# Altium PCB Sound_Sensor.PcbDoc (part 1 of 6)
Units mm, origin at the board's own origin, x right, y up, seen from the top; angles counter-clockwise.
Board outline 90.25 x 88.01 mm, 2 copper layers (Top Layer, Bottom Layer), stack 1.448 mm thick; 369 components, 272 nets, 1045 pads, 508 vias.
Unrouted connection lines stored in the file: 15.
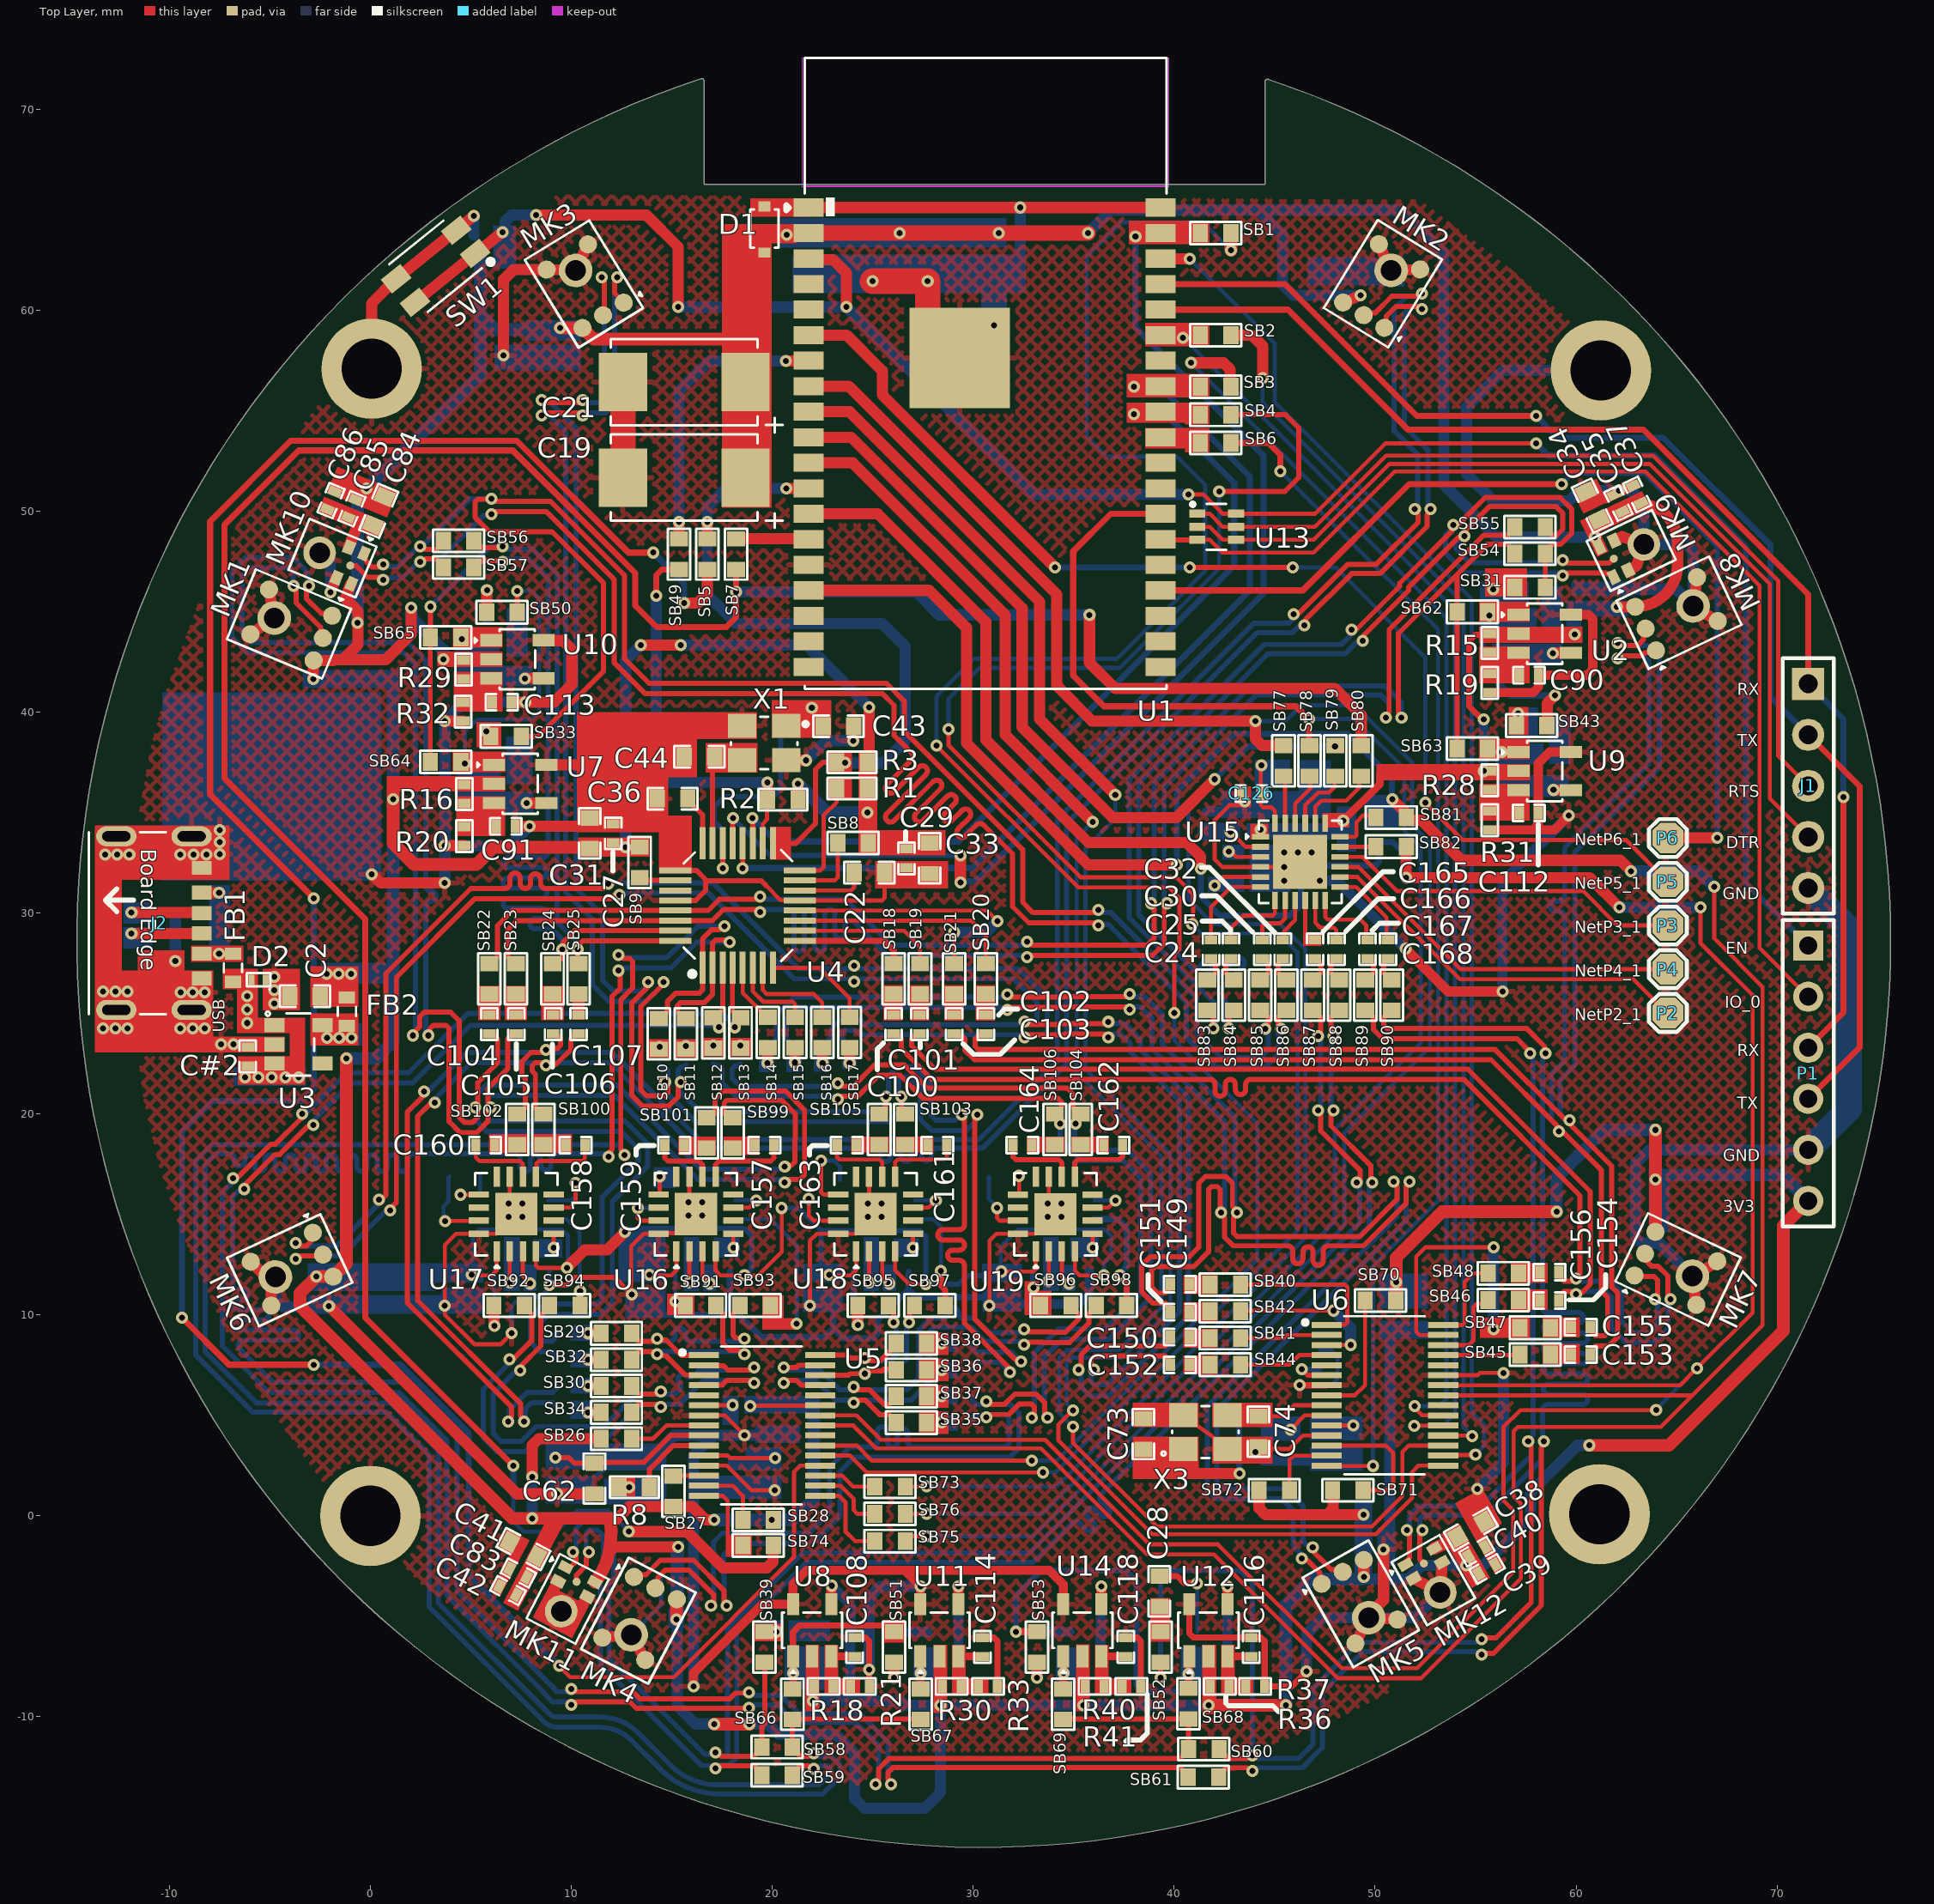
[diagram p0: Top Layer view]
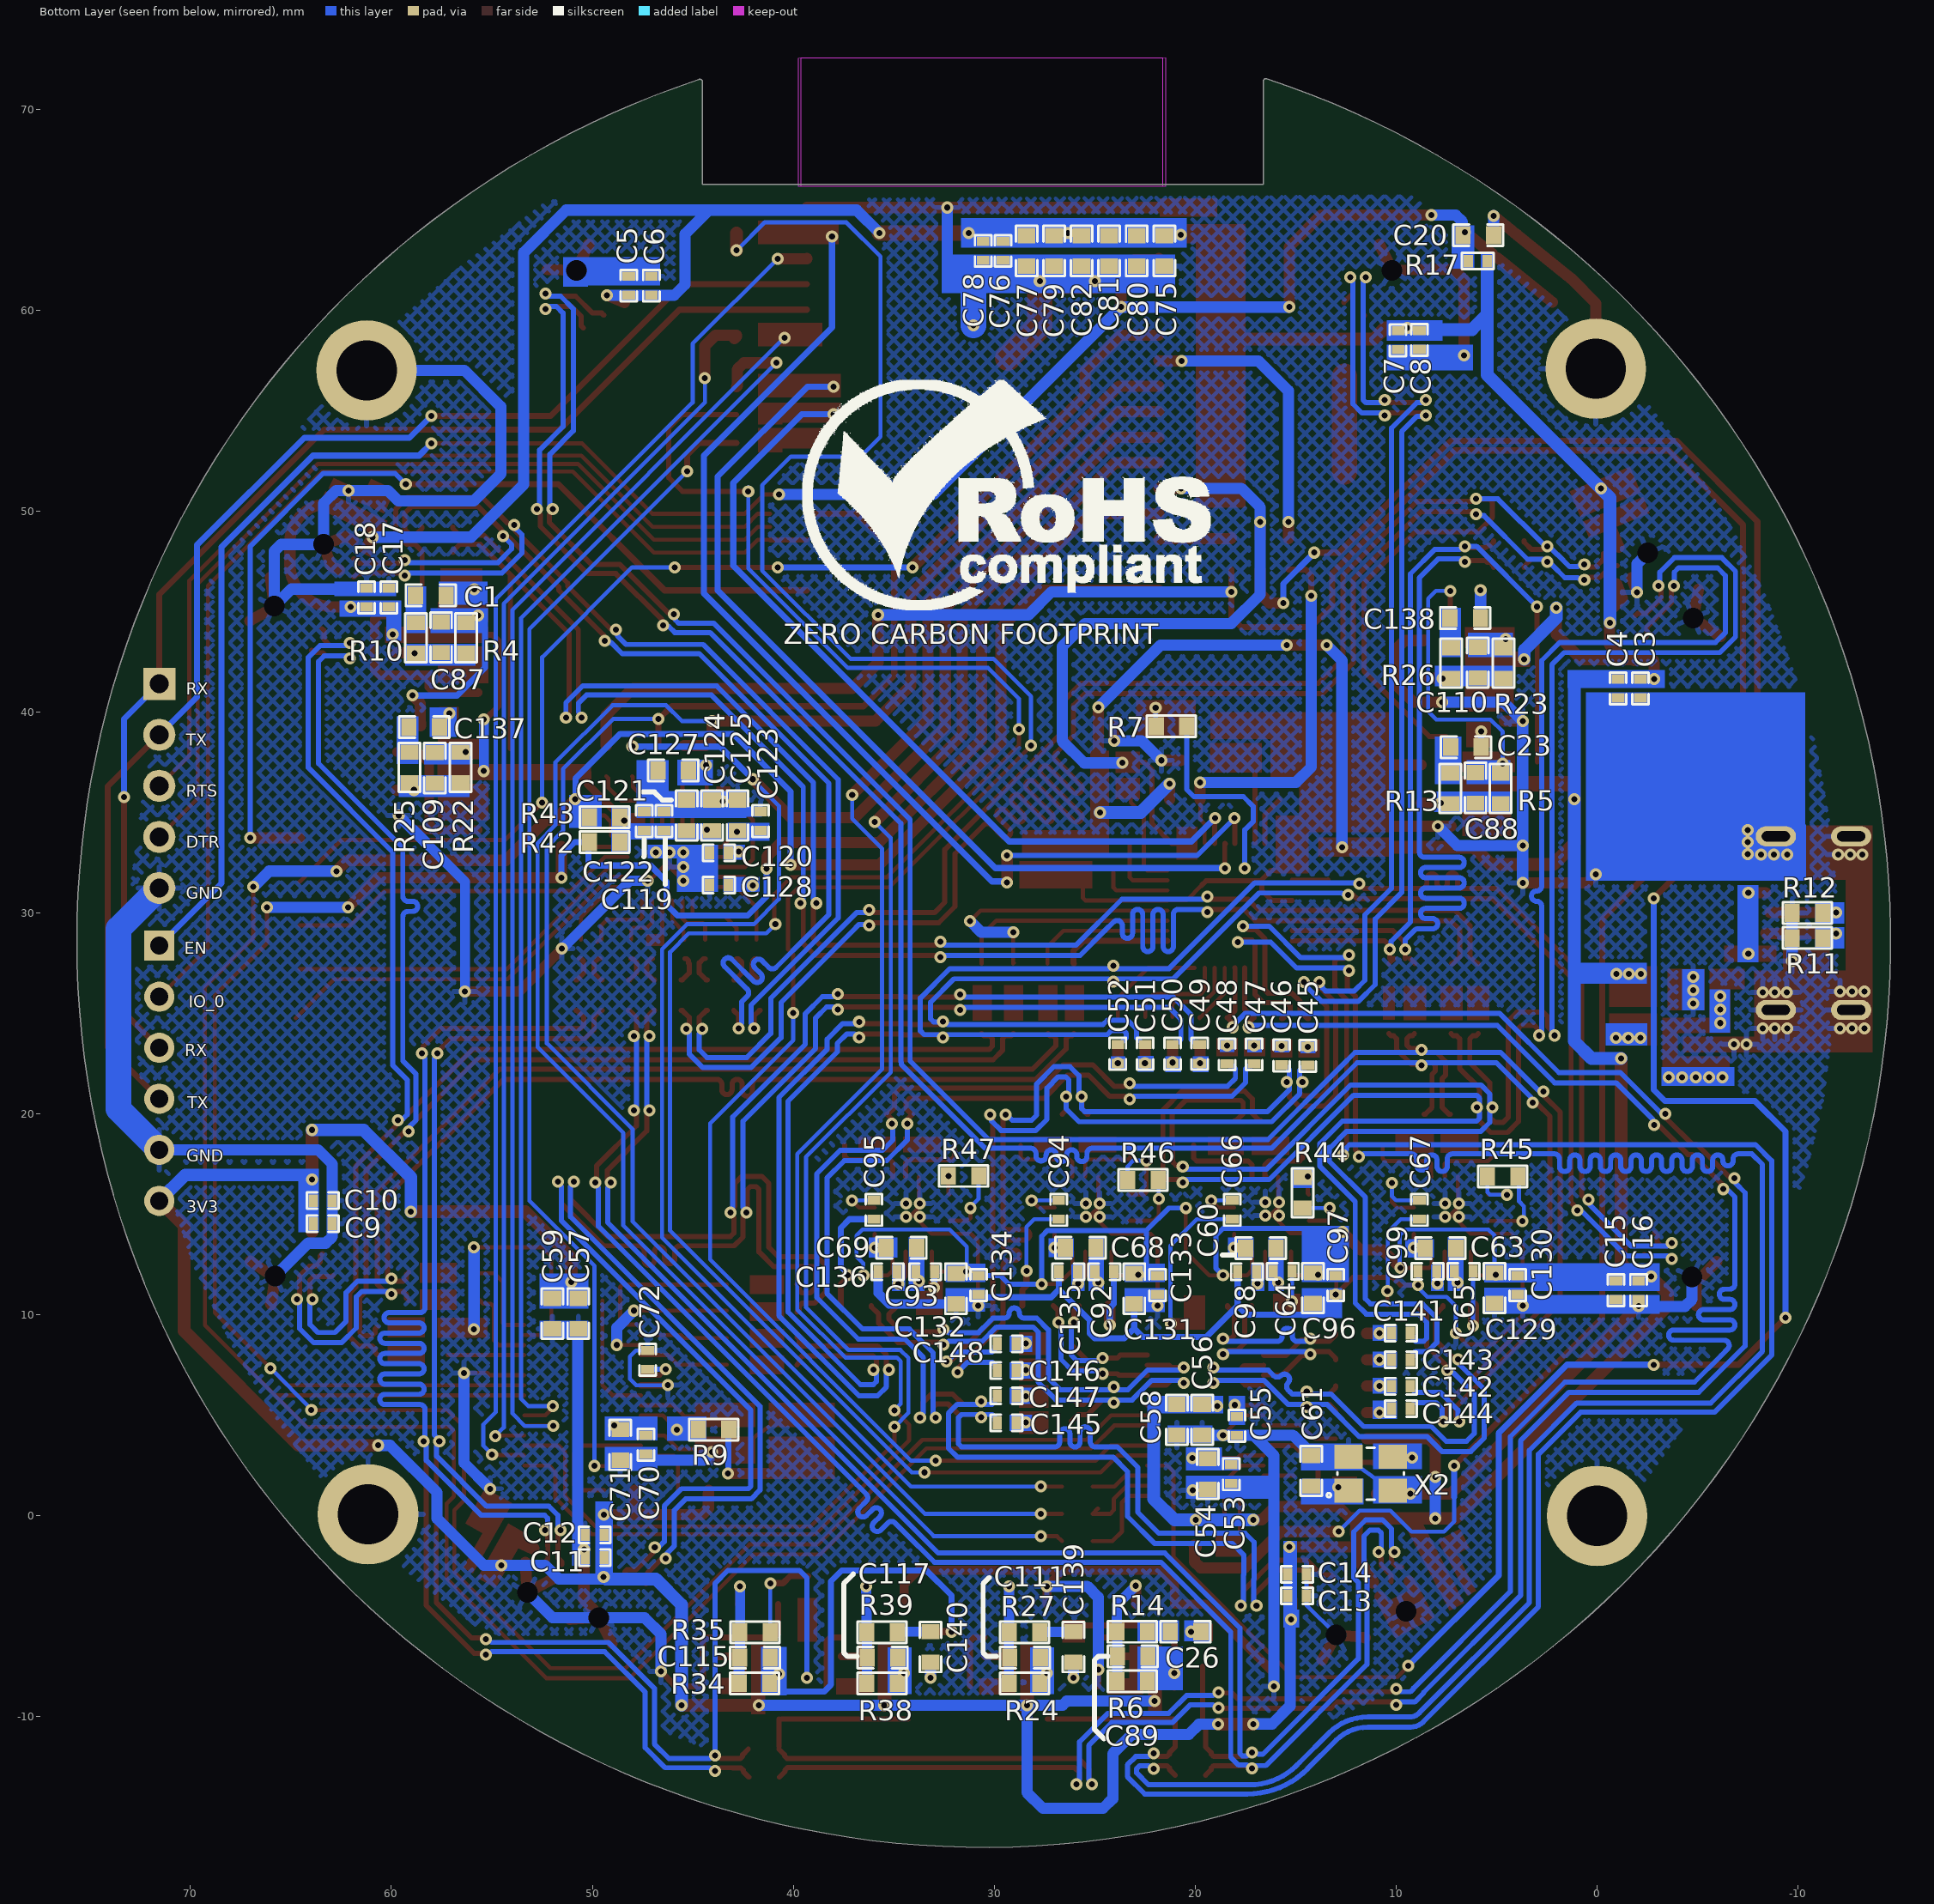
[diagram p1: Bottom Layer view, seen from below]
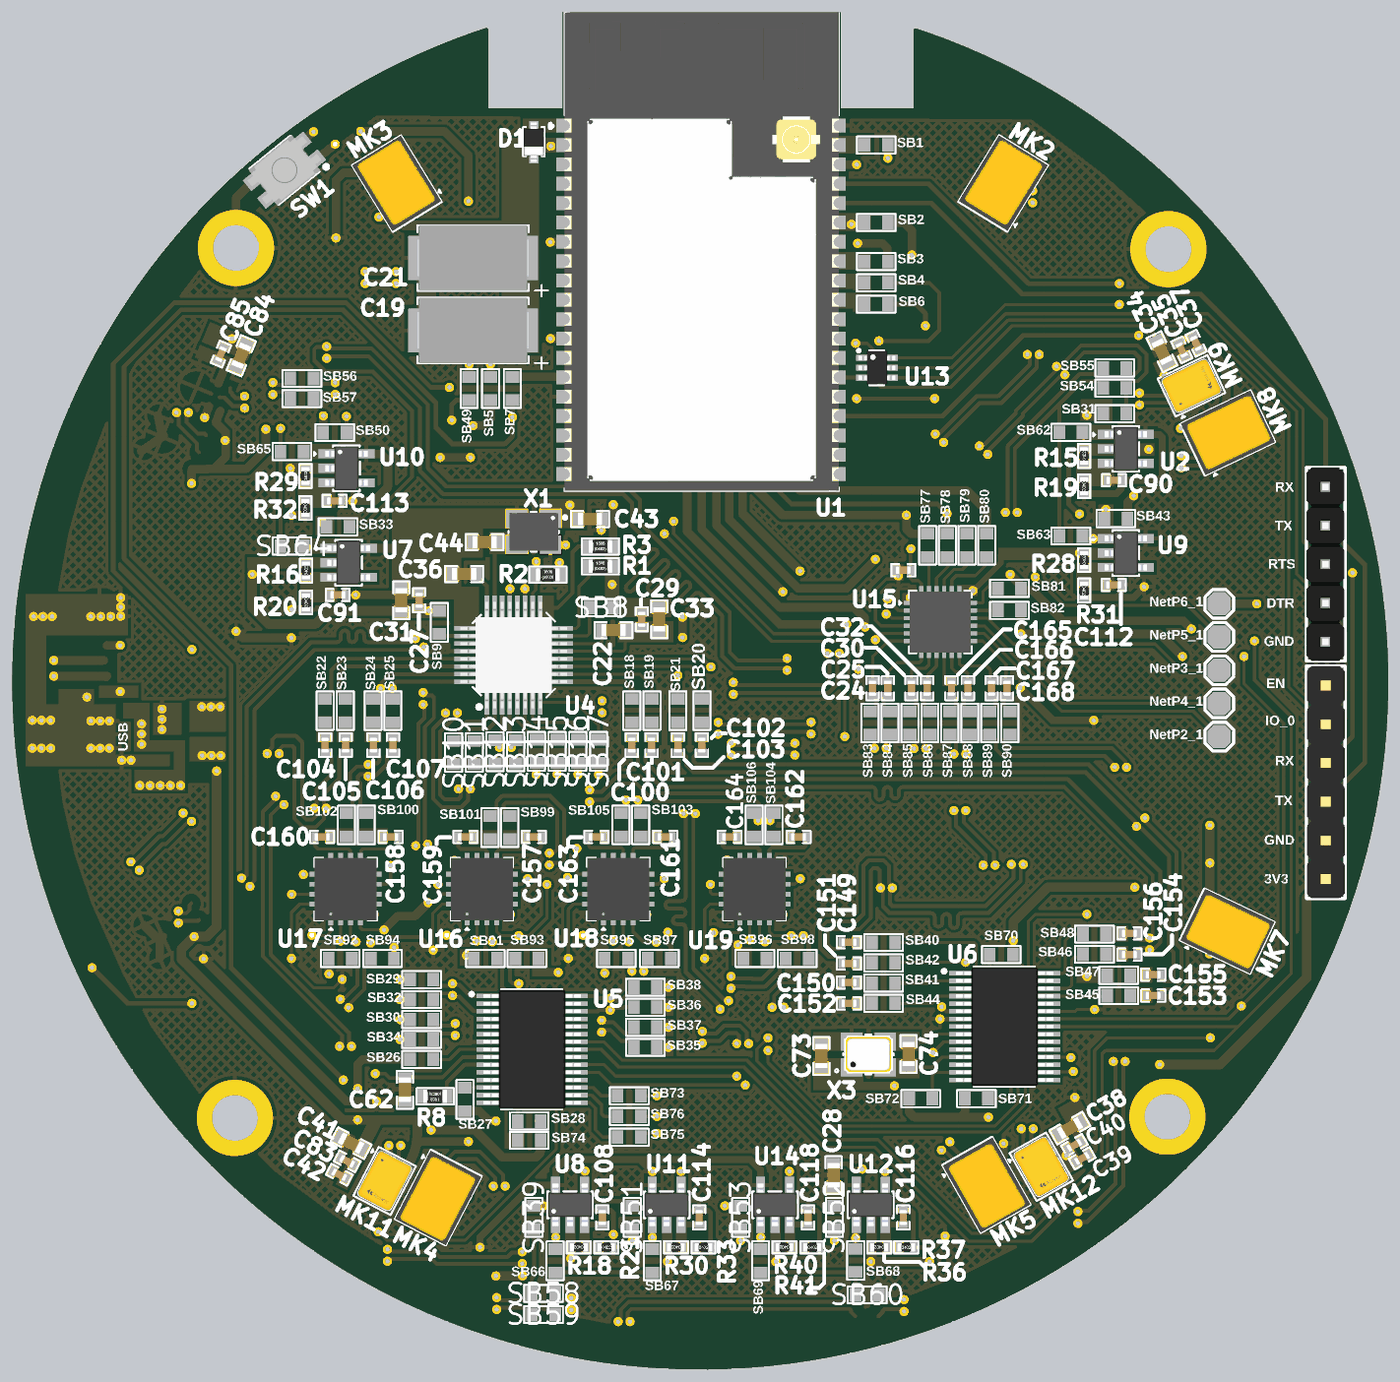
[diagram p6: 3D render of the assembled board from above, using the file's embedded part models]
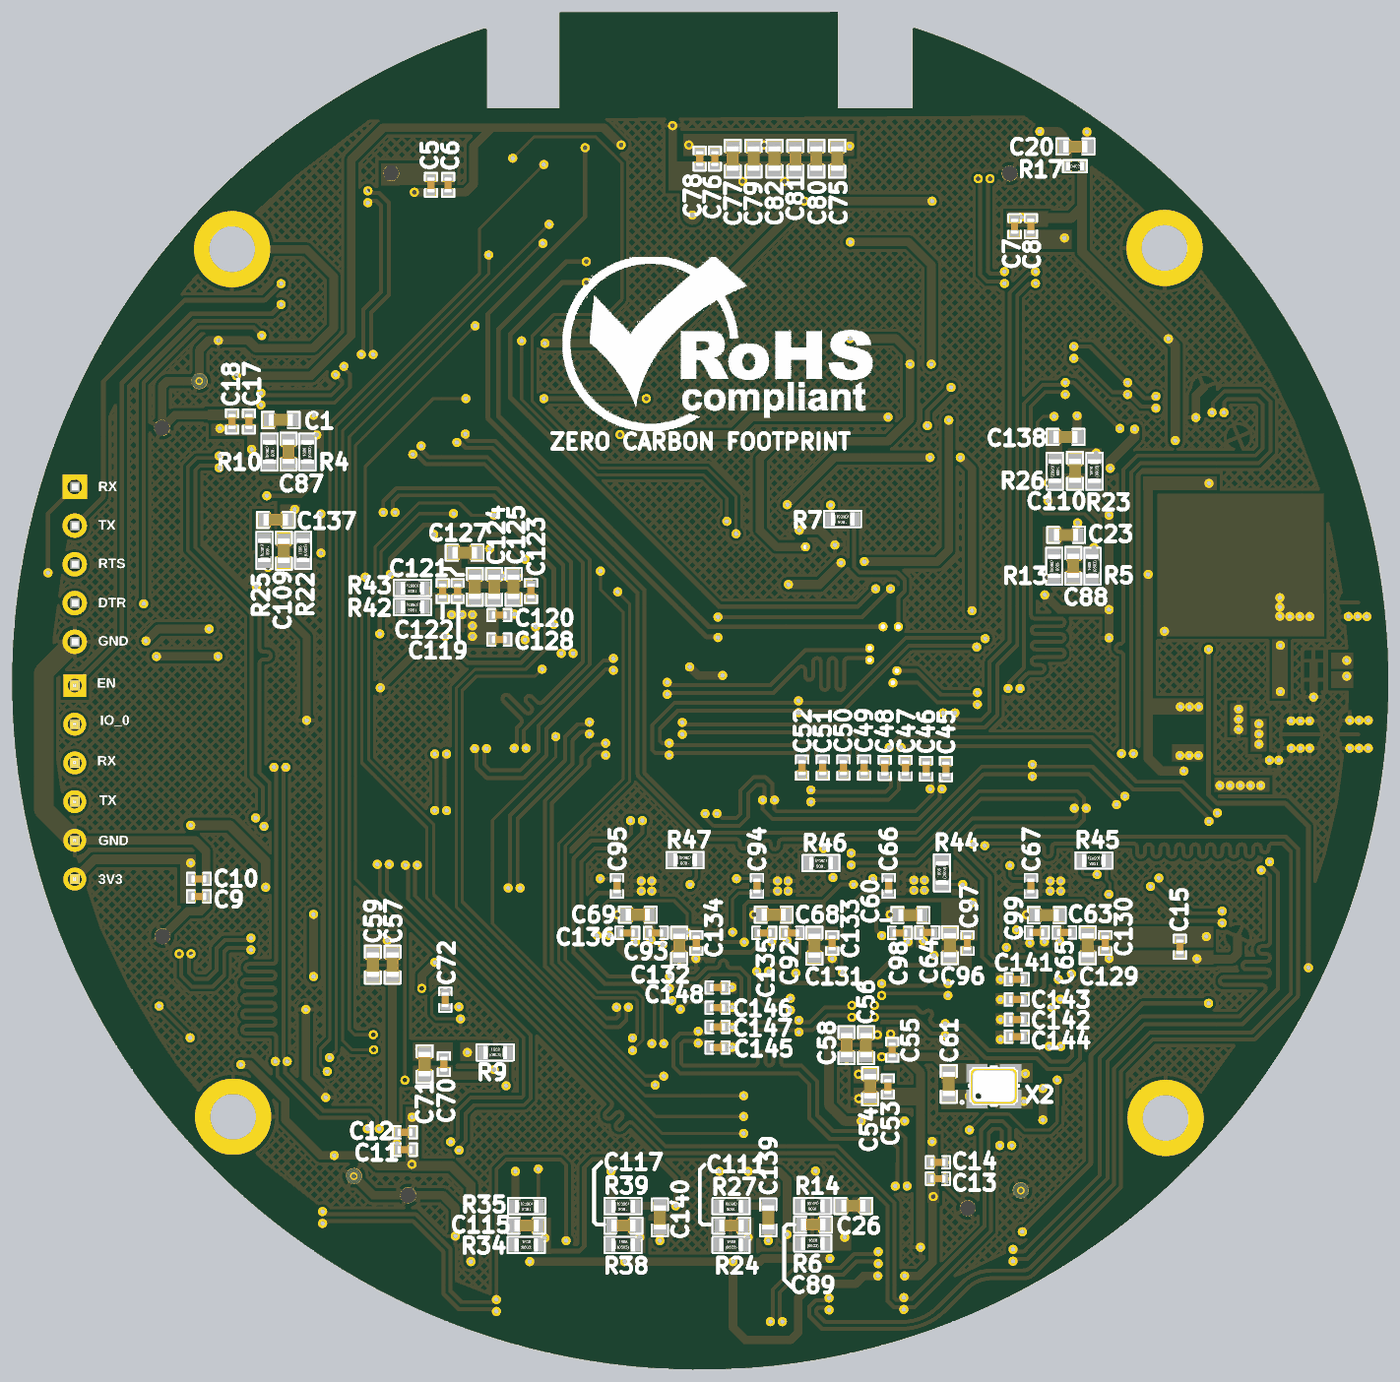
[diagram p7: 3D render of the assembled board from below, using the file's embedded part models]

## Layer stack, top to bottom
Top Solder: solder mask 0.0762, Solder Resist, Dk 3.5
Top Layer: signal copper 0.254
Dielectric 1: dielectric 0.9398, FR-4, Dk 4.8
Bottom Layer: signal copper 0.254
Bottom Solder: solder mask 0.0762, Solder Resist, Dk 3.5

## Board outline
16.616,66.244 44.521,66.244 44.521,71.356 cw(c44.649,71.356) 44.714,71.465 cw(c30.523,28.627) 75.65,28.627 cw(c30.523,28.627) 16.444,71.502 cw(c16.484,71.381) 16.486,71.509 cw(c16.488,71.381) 16.616,71.381
cut-out: 21.488,72.553 21.488,66.142 39.751,66.142 39.751,72.527

## Design rules (kind name [scope] priority, off if disabled: settings)
Clearance [All] p1: gap=0.178 ignorepadtopadclearanceinfootprint=FALSE except(0: Arc-Hole Track-Hole SMDPad-Hole THPad-Hole Via-Hole Fill-Hole Poly-Hole Region-Hole Text-Hole; 0.102: Arc-SMDPad Track-SMDPad SMDPad-SMDPad)
ComponentClearance [All] p1: gap=0 collisioncheckmode=3 verticalgap=0 showdistances=FALSE
DiffPairsRouting [All] p1: maxlimit=0.254 minlimit=0.254 mostfreqgap=0.254 toplayer_minwidth=0.254 toplayer_maxwidth=0.254 toplayer_prefwidth=0.254 bottomlayer_minwidth=0.254 bottomlayer_maxwidth=0.254 bottomlayer_prefwidth=0.254 maxuncoupledlength=12.7
HoleSize [All] p1: absolutevalues=TRUE maxlimit=25.4 minlimit=0.025 maxpercent=80.000 minpercent=20.000
HoleToHoleClearance [All] p1: gap=0 allowstackedmicrovias=TRUE
Length [All] p1: maxlimit=2540 minlimit=0
MatchedLengths [All] p1: tolerance=0.508 checknetsindiffpair=TRUE checkdiffpairvsdiffpair=FALSE checkxsignals=FALSE checkothers=FALSE
MaxMinImpedance [All] p1: minimum=10.00 maximum=95.00
MinimumSolderMaskSliver [All] p1: minsoldermaskwidth=0
PolygonConnect [All] p1: connectstyle=Relief reliefconductorwidth=0.254 reliefentries=4 polygonreliefangle="90 Angle" airgapwidth=0.254
RoutingVias [All] p1: holewidth=0.3 width=0.6 viastyle="Through Hole" minholewidth=0.3 minwidth=0.6 maxholewidth=0.3 maxwidth=0.6
SignalStimulus [All] p1: kind=1 level=0 starttime=10.00n stoptime=60.00n periodtime=100.0n
SilkToSilkClearance [All] p1: silktosilkclearance=0
SilkToSolderMaskClearance [IsPad] p1: minsilkscreentomaskgap=0 clearancetoexposedcopper=TRUE
SolderMaskExpansion SolderMaskExpansion_1 [IsVia] p1: expansion=0.051 istentingtop=FALSE soldermaskfromhole=TRUE
SolderMaskExpansion [Not IsVia] p2: expansion=0.102 istentingtop=FALSE
Width [All] p1: maxlimit=1.27 minlimit=0.203 preferedwidth=0.559 minimp=50.000000 maximp=50.000000 favimp=50.000000
23 further rules are at their usual default settings.

## Classes and differential pairs
differential pair class PCM2_Lines: PCM2
net class PCM2: PCM2_N PCM2_P
differential pair class TLV_IN4_Lines: TLV_ADC.TLV_IN4
differential pair class TLV_IN3_Lines: TLV_ADC.TLV_IN3
differential pair class TLV_IN2_Lines: TLV_ADC.TLV_IN2
differential pair class TLV_IN1_Lines: TLV_ADC.TLV_IN1
net class TLV_IN4: TLV_ADC.TLV_IN4_N TLV_ADC.TLV_IN4_P
net class TLV_IN3: TLV_ADC.TLV_IN3_N TLV_ADC.TLV_IN3_P
net class TLV_IN2: TLV_ADC.TLV_IN2_N TLV_ADC.TLV_IN2_P
net class TLV_IN1: TLV_ADC.TLV_IN1_N TLV_ADC.TLV_IN1_P
differential pair class PCM4_Lines: PCM4
differential pair class PCM3_Lines: PCM3
differential pair class PCM1_Lines: PCM1
differential pair class M2_OUT4_Lines: M2_OUT4
differential pair class M2_OUT3_Lines: M2_OUT3
differential pair class M2_OUT2_Lines: M2_OUT2
differential pair class M2_OUT1_Lines: M2_OUT1
differential pair class AIN3_Lines: ADS_Pins.AIN3
differential pair class AIN2_Lines: ADS_Pins.AIN2
differential pair class AIN1_Lines: ADS_Pins.AIN1
differential pair class AIN0_Lines: ADS_Pins.AIN0
net class PCM4: PCM4_N PCM4_P
net class PCM3: PCM3_N PCM3_P
net class PCM1: PCM1_N PCM1_P
net class M2_OUT4: M2_OUT4_N M2_OUT4_P
net class M2_OUT3: M2_OUT3_N M2_OUT3_P
net class M2_OUT2: M2_OUT2_N M2_OUT2_P
net class M2_OUT1: M2_OUT1_N M2_OUT1_P
net class AIN3: ADS_Pins.AIN3_N ADS_Pins.AIN3_P
net class AIN2: ADS_Pins.AIN2_N ADS_Pins.AIN2_P
net class AIN1: ADS_Pins.AIN1_N ADS_Pins.AIN1_P
net class AIN0: ADS_Pins.AIN0_N ADS_Pins.AIN0_P
component class U_Sensor_Sheet_2: C34 C35 C37 C38 C39 C40 C41 C42 C83 C84 C85 C86 MK9 MK10 MK11 MK12 SB54 SB55 SB56 SB57 SB58 SB59 SB60 SB61 SB83 SB84 SB85 SB86 SB87 SB88 SB89 SB90
component class U_Diff_Amplifier_Sheet: C60 C63 C64 C65 C66 C67 C68 C69 C92 C93 C94 C95 C96 C97 C98 C99 C129 C130 C131 C132 C133 C134 C135 C136 C157 C158 C159 C160 C161 C162 C163 C164 R44 R45 R46 R47 SB91 SB92 SB93 SB94 SB95 SB96 SB97 SB98 SB99 SB100 SB101 SB102 SB103 SB104 SB105 SB106 U16 U17 U18 U19
component class U_Amplifier_Sheet: C1 C23 C26 C28 C87 C88 C89 C90 C91 C108 C109 C110 C111 C112 C113 C114 C115 C116 C117 C118 C137 C138 C139 C140 R4 R5 R6 R10 R13 R14 R15 R16 R18 R19 R20 R21 R22 R23 R24 R25 R26 R27 R28 R29 R30 R31 R32 R33 R34 R35 R36 R37 R38 R39 R40 R41 SB31 SB33 SB39 SB43 SB50 SB51 SB52 SB53 SB62 SB63 SB64 SB65 SB66 SB67 SB68 SB69 ss U2 U7 U8 U9 U10 U11 U12 U14
component class U_ADC_3_Section: C24 C25 C30 C32 C119 C120 C121 C122 C123 C124 C125 C126 C127 C128 C165 C166 C167 C168 P2 P3 P4 R42 R43 SB77 SB78 SB79 SB80 SB81 SB82 U15
differential pair class OUT8_Lines: MIC_OUTS.OUT8
differential pair class OUT7_Lines: MIC_OUTS.OUT7
differential pair class OUT6_Lines: MIC_OUTS.OUT6
differential pair class OUT5_Lines: MIC_OUTS.OUT5
differential pair class OUT4_Lines: MIC_OUTS.OUT4
differential pair class OUT3_Lines: MIC_OUTS.OUT3
differential pair class OUT2_Lines: MIC_OUTS.OUT2
differential pair class OUT1_Lines: ADS_Pins.AIN0 ADS_Pins.AIN1 ADS_Pins.AIN2 ADS_Pins.AIN3 M2_OUT1 M2_OUT2 M2_OUT3 M2_OUT4 MIC_OUTS.OUT1 PCM1 PCM2 PCM3 PCM4 TLV_ADC.TLV_IN1 TLV_ADC.TLV_IN2 TLV_ADC.TLV_IN3 TLV_ADC.TLV_IN4
net class OUT8: MIC_OUTS.OUT8_N MIC_OUTS.OUT8_P
net class OUT7: MIC_OUTS.OUT7_N MIC_OUTS.OUT7_P
net class OUT6: MIC_OUTS.OUT6_N MIC_OUTS.OUT6_P
net class OUT5: MIC_OUTS.OUT5_N MIC_OUTS.OUT5_P
net class OUT4: MIC_OUTS.OUT4_N MIC_OUTS.OUT4_P
net class OUT3: MIC_OUTS.OUT3_N MIC_OUTS.OUT3_P
net class OUT2: MIC_OUTS.OUT2_N MIC_OUTS.OUT2_P
net class OUT1: ADS_Pins.AIN0_N ADS_Pins.AIN0_P ADS_Pins.AIN1_N ADS_Pins.AIN1_P ADS_Pins.AIN2_N ADS_Pins.AIN2_P ADS_Pins.AIN3_N ADS_Pins.AIN3_P M2_OUT1_N M2_OUT1_P M2_OUT2_N M2_OUT2_P M2_OUT3_N M2_OUT3_P M2_OUT4_N M2_OUT4_P MIC_OUTS.OUT1_N MIC_OUTS.OUT1_P PCM1_N PCM1_P PCM2_N PCM2_P PCM3_N PCM3_P PCM4_N PCM4_P TLV_ADC.TLV_IN1_N TLV_ADC.TLV_IN1_P TLV_ADC.TLV_IN2_N TLV_ADC.TLV_IN2_P TLV_ADC.TLV_IN3_N TLV_ADC.TLV_IN3_P TLV_ADC.TLV_IN4_N TLV_ADC.TLV_IN4_P
component class U_Sensor_Sheet: C3 C4 C5 C6 C7 C8 C9 C10 C11 C12 C13 C14 C15 C16 C17 C18 MK1 MK2 MK3 MK4 MK5 MK6 MK7 MK8
component class U_Power_Section: C2 C#2 FB2 U3
component class U_Controller_Sheet: C19 C20 C21 C75 C76 C77 C78 C79 C80 C81 C82 D1 P5 P6 R17 SB1 SB2 SB3 SB4 SB5 SB6 SB7 SB49 SSS SW1 U1 U13
component class U_Connector_Sheet: D2 FB1 J1 J2 j2 P1 R11 R12
component class U_ADC_2_Section: C53 C54 C55 C56 C57 C58 C59 C61 C62 C70 C71 C72 C73 C74 C141 C142 C143 C144 C145 C146 C147 C148 C149 C150 C151 C152 C153 C154 C155 C156 R8 R9 SB26 SB27 SB28 SB29 SB30 SB32 SB34 SB35 SB36 SB37 SB38 SB40 SB41 SB42 SB44 SB45 SB46 SB47 SB48 SB70 SB71 SB72 SB73 SB74 SB75 SB76 SSS U5 U6 X2 X3
component class U_ADC_1_Section: C22 C27 C29 C31 C33 C36 C43 C44 C45 C46 C47 C48 C49 C50 C51 C52 C100 C101 C102 C103 C105 C106 C107 R1 R2 R3 R7 SB8 SB9 SB10 SB11 SB12 SB13 SB14 SB15 SB16 SB17 SB18 SB19 SB20 SB21 SB22 SB23 SB24 SB25 SSS U4 X1
differential pair TLV_ADC.TLV_IN4: +TLV_ADC.TLV_IN4_P -TLV_ADC.TLV_IN4_N
differential pair TLV_ADC.TLV_IN3: +TLV_ADC.TLV_IN3_P -TLV_ADC.TLV_IN3_N
differential pair TLV_ADC.TLV_IN2: +TLV_ADC.TLV_IN2_P -TLV_ADC.TLV_IN2_N
differential pair TLV_ADC.TLV_IN1: +TLV_ADC.TLV_IN1_P -TLV_ADC.TLV_IN1_N
differential pair PCM4: +PCM4_P -PCM4_N
differential pair PCM3: +PCM3_P -PCM3_N
differential pair PCM2: +PCM2_P -PCM2_N
differential pair PCM1: +PCM1_P -PCM1_N
differential pair M2_OUT4: +M2_OUT4_P -M2_OUT4_N
differential pair M2_OUT3: +M2_OUT3_P -M2_OUT3_N
differential pair M2_OUT2: +M2_OUT2_P -M2_OUT2_N
differential pair M2_OUT1: +M2_OUT1_P -M2_OUT1_N
differential pair ADS_Pins.AIN3: +ADS_Pins.AIN3_P -ADS_Pins.AIN3_N
differential pair ADS_Pins.AIN2: +ADS_Pins.AIN2_P -ADS_Pins.AIN2_N
differential pair ADS_Pins.AIN1: +ADS_Pins.AIN1_P -ADS_Pins.AIN1_N
differential pair ADS_Pins.AIN0: +ADS_Pins.AIN0_P -ADS_Pins.AIN0_N
differential pair MIC_OUTS.OUT8: +MIC_OUTS.OUT8_P -MIC_OUTS.OUT8_N
differential pair MIC_OUTS.OUT7: +MIC_OUTS.OUT7_P -MIC_OUTS.OUT7_N
differential pair MIC_OUTS.OUT6: +MIC_OUTS.OUT6_P -MIC_OUTS.OUT6_N
differential pair MIC_OUTS.OUT5: +MIC_OUTS.OUT5_P -MIC_OUTS.OUT5_N
differential pair MIC_OUTS.OUT4: +MIC_OUTS.OUT4_P -MIC_OUTS.OUT4_N
differential pair MIC_OUTS.OUT3: +MIC_OUTS.OUT3_P -MIC_OUTS.OUT3_N
differential pair MIC_OUTS.OUT2: +MIC_OUTS.OUT2_P -MIC_OUTS.OUT2_N
differential pair MIC_OUTS.OUT1: +MIC_OUTS.OUT1_P -MIC_OUTS.OUT1_N

## Components (designator, comment, footprint, x,y, rotation, side; value= is the part's Value field where it differs from the comment)
C1 "4.7uF" Cap-0603 58.039,45.796 r0 bottom locked
C2 "4.7uF" Cap-0603 -3.251,25.857 r180 top locked
C3 "1uF" CAP-0402 -2.159,41.166 r270 bottom locked
C4 "220pF" "Cap 0402" -1.041,41.166 r270 bottom locked
C5 "1uF" CAP-0402 48.184,61.214 r90 bottom locked
C6 "220pF" "Cap 0402" 47.066,61.214 r90 bottom locked
C7 "1uF" CAP-0402 9.906,58.496 r270 bottom locked
C8 "220pF" "Cap 0402" 8.839,58.509 r270 bottom locked
C9 "1uF" CAP-0402 63.413,14.539 r180 bottom locked
C10 "220pF" "Cap 0402" 63.413,15.681 r180 bottom locked
C11 "1uF" CAP-0402 49.886,-2.083 r0 bottom locked
C12 "220pF" "Cap 0402" 49.886,-0.94 r0 bottom locked
C13 "1uF" CAP-0402 14.935,-3.988 r180 bottom locked
C14 "220pF" "Cap 0402" 14.935,-2.909 r180 bottom locked
C15 "1uF" CAP-0402 -0.94,11.227 r270 bottom locked
C16 "220pF" "Cap 0402" -2.057,11.227 r270 bottom locked
C17 "1uF" CAP-0402 60.122,45.695 r90 bottom locked
C18 "220pF" "Cap 0402" 61.239,45.695 r90 bottom locked
C19 "680uF" CASE-D 15.621,56.413 r180 top locked
C20 "100nF" CAP-0603 5.918,63.729 r180 bottom locked
C21 "680uF" CASE-D 15.621,51.664 r180 top locked
C22 "100nF" CAP-0603 24.833,32.006 r0 top locked
C23 "4.7uF" Cap-0603 6.528,38.252 r0 bottom locked
C24 "1uF" Cap-0402 41.834,28.194 r90 top locked
C25 "1uF" Cap-0402 42.828,28.194 r90 top locked
C26 "4.7uF" Cap-0603 20.485,-5.766 r0 bottom locked
C27 "1uF" CAP-0402 12.083,33.961 r90 top locked
C28 "4.7uF" Cap-0603 39.268,-3.759 r90 top locked
C29 "1uF" CAP-0402 26.688,32.717 r270 top locked
C30 "1uF" Cap-0402 44.381,28.194 r90 top locked
C31 "100nF" CAP-0603 10.914,33.961 r90 top locked
C32 "1uF" Cap-0402 45.401,28.194 r90 top locked
C33 "100nF" CAP-0603 27.831,32.717 r270 top locked
C34 "100nF" CAP-0603 60.808,50.267 r115.5 top locked
C35 "1uF" CAP-0402 62.106,50.389 r115.5 top locked
C36 "220nF" "Cap 0603" 15.037,35.687 r180 top locked
C37 "220pF" "Cap 0402" 63.043,50.825 r115.5 top locked
C38 "100nF" CAP-0603 54.765,-0.666 r29.5 top locked
C39 "1uF" CAP-0402 55.573,-2.644 r29.5 top locked
C40 "220pF" "Cap 0402" 55.065,-1.781 r29.5 top locked
C41 "100nF" CAP-0603 7.62,-1.651 r152.5 top locked
C42 "1uF" CAP-0402 6.848,-3.72 r152.5 top locked
C43 "18pF" "Cap 0603" 23.292,39.294 r180 top locked
C44 "18pF" "Cap 0603" 16.375,37.771 r0 top locked
C45 "100nF" Cap-0402 14.402,22.885 r90 bottom locked
C46 "100nF" Cap-0402 15.708,22.911 r90 bottom locked
C47 "100nF" Cap-0402 17.065,22.962 r90 bottom locked
C48 "100nF" Cap-0402 18.422,22.962 r90 bottom locked
C49 "100nF" Cap-0402 19.779,22.987 r270 bottom locked
C50 "100nF" Cap-0402 21.136,22.987 r270 bottom locked
C51 "100nF" Cap-0402 22.494,22.987 r270 bottom locked
C52 "100nF" Cap-0402 23.851,22.987 r270 bottom locked
C53 "1uF" CAP-0402 18.212,2.07 r90 bottom locked
C54 "100nF" CAP-0603 19.38,2.083 r90 bottom locked
C55 "1uF" CAP-0402 17.932,4.47 r270 bottom locked
C56 "10uF" CAP-0603 19.652,4.777 r270 bottom locked
C57 "10uF" CAP-0603 50.698,10.058 r270 bottom locked
C58 "100nF" CAP-0603 20.922,4.777 r270 bottom locked
C59 "100nF" CAP-0603 51.994,10.058 r270 bottom locked
C60 "10pF" CAP-0603 16.739,13.31 r180 bottom locked
C61 "18pF" "Cap 0603" 14.224,2.235 r270 bottom locked
C62 "18pF" "Cap 0603" 11.151,1.854 r90 top locked
C63 "10pF" CAP-0603 7.798,13.31 r180 bottom locked
C64 "1uF" CAP-0402 15.646,12.167 r180 bottom locked
C65 "1uF" CAP-0402 6.642,12.167 r180 bottom locked
C66 "1uF" CAP-0402 18.161,15.227 r270 bottom locked
C67 "1uF" CAP-0402 8.839,15.227 r270 bottom locked
C68 "10pF" CAP-0603 25.705,13.335 r180 bottom locked
C69 "10pF" CAP-0603 34.62,13.335 r180 bottom locked
C70 "1uF" CAP-0402 47.338,3.532 r90 bottom locked
C71 "100nF" CAP-0603 48.608,3.532 r90 bottom locked
C72 "1uF" CAP-0402 47.244,7.76 r90 bottom locked
C73 "18pF" "Cap 0603" 38.473,4.066 r270 top locked
C74 "18pF" "Cap 0603" 44.188,4.193 r90 top locked
C75 "10uF" CAP-0603 21.539,62.941 r270 bottom locked
C76 "1uF" CAP-0402 29.566,62.941 r270 bottom locked
C77 "100nF" CAP-0603 28.397,62.941 r270 bottom locked
C78 "1uF" CAP-0402 30.556,62.941 r270 bottom locked
C79 "100nF" CAP-0603 27.026,62.941 r270 bottom locked
C80 "100pF" "Cap 0603" 22.911,62.941 r270 bottom locked
C81 "100nF" CAP-0603 24.282,62.941 r270 bottom locked
C82 "100nF" CAP-0603 25.654,62.941 r270 bottom locked
C83 "220pF" "Cap 0402" 7.366,-2.845 r152.5 top locked
C84 "100nF" CAP-0603 0.419,50.005 r247.5 top locked
C85 "1uF" CAP-0402 -0.914,50.114 r247.5 top locked
C86 "220pF" "Cap 0402" -1.956,50.521 r247.5 top locked
C87 "27pF" CAP-0603 57.531,43.713 r90 bottom locked
C88 "27pF" CAP-0603 6.058,36.22 r90 bottom locked
C89 "27pF" CAP-0603 23.114,-6.998 r180 bottom locked
C90 "1uF" CAP-0402 57.658,41.834 r180 top locked
C91 "1uF" CAP-0402 6.744,34.315 r180 top locked
C92 "1uF" CAP-0402 24.524,12.141 r180 bottom locked
C93 "1uF" CAP-0402 33.439,12.141 r180 bottom locked
C94 "1uF" CAP-0402 26.797,15.227 r270 bottom locked
C95 "1uF" CAP-0402 35.992,15.227 r270 bottom locked
C96 "10uF" CAP-0603 14.148,11.328 r270 bottom locked
C97 "100nF" CAP-0402 13.005,11.481 r270 bottom locked
C98 "1uF" CAP-0402 17.424,12.141 r180 bottom locked
C99 "1uF" CAP-0402 8.445,12.167 r180 bottom locked
C100 "100nF" Cap-0402 26.035,24.46 r90 top locked
C101 "100nF" Cap-0402 27.33,24.46 r90 top locked
C102 "100nF" Cap-0402 30.632,24.46 r90 top locked
C103 "100nF" Cap-0402 29.058,24.46 r90 top locked
C104 "100nF" Cap-0402 5.918,24.46 r90 top locked
C105 "100nF" Cap-0402 7.264,24.46 r90 top locked
C106 "100nF" Cap-0402 9.093,24.46 r90 top locked
C107 "100nF" Cap-0402 10.363,24.46 r90 top locked
C108 "1uF" CAP-0402 24.105,-6.528 r270 top locked
C109 "27pF" CAP-0603 57.836,37.211 r90 bottom locked
C110 "27pF" CAP-0603 5.944,42.455 r90 bottom locked
C111 "27pF" CAP-0603 28.473,-7.061 r180 bottom locked
C112 "1uF" CAP-0402 57.645,34.976 r180 top locked
C113 "1uF" CAP-0402 6.54,40.486 r180 top locked
C114 "1uF" CAP-0402 30.455,-6.528 r270 top locked
C115 "27pF" CAP-0603 41.91,-7.061 r180 bottom locked
C116 "1uF" CAP-0402 43.84,-6.528 r270 top locked
C117 "27pF" CAP-0603 35.56,-7.061 r180 bottom locked
C118 "1uF" CAP-0402 37.592,-6.528 r270 top locked
C119 "100nF" CAP-0402 46.431,34.569 r270 bottom locked
C120 "1uF" CAP-0402 43.701,32.993 r0 bottom locked
C121 "10uF" CAP-0603 45.314,34.849 r270 bottom locked
C122 "100nF" CAP-0402 47.422,34.569 r270 bottom locked
C123 "100nF" CAP-0402 41.631,34.569 r90 bottom locked
C124 "10uF" CAP-0603 44.044,34.849 r270 bottom locked
C125 "10uF" CAP-0603 42.774,34.849 r90 bottom locked
C126 "100nF" CAP-0402 43.84,35.941 r180 top locked
C127 "10uF" CAP-0603 45.974,37.084 r0 bottom locked
C128 "1uF" CAP-0402 43.701,31.394 r180 bottom locked
C129 "10uF" CAP-0603 5.105,11.328 r270 bottom locked
C130 "100nF" CAP-0402 3.962,11.481 r270 bottom locked
C131 "10uF" CAP-0603 23.038,11.303 r270 bottom locked
C132 "10uF" CAP-0603 31.902,11.303 r270 bottom locked
C133 "100nF" CAP-0402 21.869,11.481 r270 bottom locked
C134 "100nF" CAP-0402 30.785,11.481 r270 bottom locked
C135 "1uF" CAP-0402 26.314,12.141 r180 bottom locked
C136 "1uF" CAP-0402 35.306,12.141 r180 bottom locked
C137 "4.7uF" CAP-0603 58.369,39.243 r0 bottom locked
C138 "4.7uF" CAP-0603 6.566,44.677 r0 bottom locked
C139 "4.7uF" CAP-0603 26.06,-6.528 r90 bottom locked
C140 "4.7uF" CAP-0603 33.172,-6.528 r90 bottom locked
C141 "100nF" Cap-0402 9.766,9.093 r0 bottom locked
C142 "100nF" Cap-0402 9.766,6.452 r0 bottom locked
C143 "100nF" Cap-0402 9.766,7.772 r0 bottom locked
C144 "100nF" Cap-0402 9.766,5.334 r0 bottom locked
C145 "100nF" Cap-0402 29.388,4.623 r180 bottom locked
C146 "100nF" Cap-0402 29.388,7.239 r180 bottom locked
C147 "100nF" Cap-0402 29.388,5.969 r180 bottom locked
C148 "100nF" Cap-0402 29.388,8.56 r180 bottom locked
C149 "100nF" Cap-0402 40.284,11.532 r0 top locked
C150 "100nF" Cap-0402 40.284,8.89 r0 top locked
C151 "100nF" Cap-0402 40.284,10.135 r0 top locked
C152 "100nF" Cap-0402 40.284,7.518 r0 top locked
C153 "100nF" Cap-0402 60.237,8.026 r180 top locked
C154 "100nF" Cap-0402 58.674,10.719 r180 top locked
C155 "100nF" Cap-0402 60.237,9.398 r180 top locked
C156 "100nF" Cap-0402 58.674,12.116 r180 top locked
C157 "100nF" Cap-0402 19.609,18.44 r0 top locked
C158 "100nF" Cap-0402 10.211,18.44 r0 top locked
C159 "100nF" Cap-0402 15.126,18.44 r180 top locked
C160 "100nF" Cap-0402 5.715,18.44 r180 top locked
C161 "100nF" Cap-0402 28.219,18.44 r0 top locked
C162 "100nF" Cap-0402 36.97,18.44 r0 top locked
C163 "100nF" Cap-0402 23.711,18.44 r180 top locked
C164 "100nF" Cap-0402 32.448,18.44 r180 top locked
C165 "1uF" Cap-0402 47.005,28.194 r90 top locked
C166 "1uF" Cap-0402 48.075,28.194 r90 top locked
C167 "1uF" Cap-0402 49.628,28.194 r90 top locked
C168 "1uF" Cap-0402 50.648,28.194 r90 top locked
C#2 "1uF" CAP-0402 -6.096,22.86 r90 top locked
D1 "UDD32C03L01" UDD32C03L01 19.609,64.008 r90 top locked
D2 "TPD1E10B06DPYR" "X1SON - 0.45 mm max height" -5.563,26.67 r180 top locked
FB1 "BLM18SG121TN1D" "IND-0603 (1608 Metric)" -6.833,27.271 r270 top locked
FB2 "BLM18SG121TN1D" "IND-0603 (1608 Metric)" -1.168,25.084 r90 top locked
J1 "3-644456-5" HDR1X5 71.552,41.402 r270 top locked
J2 "U262-061N-4BVC11" U262-061N-4BVC11 -10.516,29.491 r270 top locked
MK1 "SPM0687LR5H-1" SPM0687LR5H-1 -3.932,44.329 r247.5 top locked
MK2 "SPM0687LR5H-1" SPM0687LR5H-1 50.323,61.198 r148.5 top locked
MK3 "SPM0687LR5H-1" SPM0687LR5H-1 10.693,61.189 r211.5 top locked
MK4 "SPM0687LR5H-1" SPM0687LR5H-1 13.401,-5.108 r332.5 top locked
MK5 "SPM0687LR5H-1" SPM0687LR5H-1 49.228,-4.275 r29.5 top locked
MK6 "SPM0687LR5H-1" SPM0687LR5H-1 -3.897,12.273 r295 top locked
MK7 "SPM0687LR5H-1" SPM0687LR5H-1 64.965,12.313 r64.5 top locked
MK8 "SPM0687LR5H-1" SPM0687LR5H-1 64.999,44.882 r115.5 top locked
MK9 "SPH8878LR5H-1" SPH8878LR5H-1 62.446,47.894 r115.5 top locked
MK10 "SPH8878LR5H-1" SPH8878LR5H-1 -1.575,47.523 r247.5 top locked
MK11 "SPH8878LR5H-1" SPH8878LR5H-1 9.974,-3.839 r332.5 top locked
MK12 "SPH8878LR5H-1" SPH8878LR5H-1 52.733,-2.916 r29.5 top locked
P1 "61300611121" HDR1X6 71.552,28.372 r270 top locked
P2 "TEST POINT" TEST-POINT 64.567,25.019 r90 top locked
P3 "TEST POINT" TEST-POINT 64.567,29.375 r90 top locked
P4 "TEST POINT" TEST-POINT 64.567,27.197 r90 top locked
P5 "TEST POINT" TEST-POINT 64.567,31.554 r0 top locked
P6 "TEST POINT" TEST-POINT 64.567,33.732 r0 top locked
R1 "100K" Res0603 23.97,36.197 r180 top locked
R2 "100K" Res0603 20.523,35.636 r180 top locked
R3 "100K" Res0603 23.97,37.492 r180 top locked
R4 "300K" Res-0603 56.286,43.688 r270 bottom locked
R5 "300K" Res-0603 4.801,36.195 r270 bottom locked
R6 "300K" Res-0603 23.139,-8.23 r0 bottom locked
R7 "0R" Res0603 21.184,39.294 r180 bottom locked
R8 "0R" Res0603 13.132,1.422 r0 top locked
R9 "0R" Res0603 43.967,4.293 r0 bottom locked
R10 "4.7K" RES-0603 58.776,43.688 r90 bottom locked
R11 "5.1K" Res0603 -10.465,28.753 r0 bottom locked
R12 "5.1K" Res0603 -10.465,29.997 r0 bottom locked
R13 "4.7K" RES-0603 7.303,36.195 r90 bottom locked
R14 "4.7K" RES-0603 23.139,-5.766 r180 bottom locked
R15 "10K" RES-0402 55.702,43.434 r90 top locked
R16 "10K" RES-0402 4.674,35.916 r90 top locked
R17 "10K" RES-0402 5.944,62.433 r180 bottom locked
R18 "10K" RES-0402 22.555,-8.484 r180 top locked
R19 "10K" RES-0402 55.702,41.44 r270 top locked
R20 "10K" RES-0402 4.674,33.82 r270 top locked
R21 "10K" RES-0402 24.359,-8.484 r0 top locked
R22 "300K" Res-0603 56.566,37.236 r270 bottom locked
R23 "300K" Res-0603 4.661,42.429 r270 bottom locked
R24 "300K" Res-0603 28.499,-8.331 r0 bottom locked
R25 "4.7K" RES-0603 59.106,37.236 r90 bottom locked
R26 "4.7K" RES-0603 7.264,42.429 r90 bottom locked
R27 "4.7K" RES-0603 28.499,-5.791 r180 bottom locked
R28 "10K" RES-0402 55.702,36.601 r90 top locked
R29 "10K" RES-0402 4.635,42.112 r90 top locked
R30 "10K" RES-0402 28.931,-8.484 r180 top locked
R31 "10K" RES-0402 55.702,34.608 r270 top locked
R32 "10K" RES-0402 4.623,40.018 r270 top locked
R33 "10K" RES-0402 30.734,-8.484 r0 top locked
R34 "300K" Res-0603 41.935,-8.331 r0 bottom locked
R35 "4.7K" RES-0603 41.91,-5.791 r180 bottom locked
R36 "10K" RES-0402 42.266,-8.484 r180 top locked
R37 "10K" RES-0402 44.031,-8.484 r0 top locked
R38 "300K" Res-0603 35.585,-8.331 r0 bottom locked
R39 "4.7K" RES-0603 35.585,-5.791 r180 bottom locked
R40 "10K" RES-0402 36.043,-8.484 r180 top locked
R41 "10K" RES-0402 37.871,-8.484 r0 top locked
R42 "4.7K" RES-0603 49.394,33.519 r180 bottom locked
R43 "4.7K" RES-0603 49.394,34.764 r180 bottom locked
R44 "11.3K" RES-0603 14.656,16.078 r270 bottom locked
R45 "11.3K" RES-0603 4.699,16.891 r180 bottom locked
R46 "11.3K" RES-0603 22.606,16.713 r180 bottom locked
R47 "11.3K" RES-0603 31.521,16.916 r180 bottom locked
SB1 "Solder Bridge" "SOLDER BRIDGE" 42.062,63.83 r0 top locked
SB2 "Solder Bridge" "SOLDER BRIDGE" 42.062,58.75 r0 top locked
SB3 "Solder Bridge" "SOLDER BRIDGE" 42.062,56.185 r0 top locked
SB4 "Solder Bridge" "SOLDER BRIDGE" 42.062,54.788 r0 top locked
SB5 "Solder Bridge" "SOLDER BRIDGE" 16.764,47.854 r90 top locked
SB6 "Solder Bridge" "SOLDER BRIDGE" 42.062,53.391 r0 top locked
SB7 "Solder Bridge" "SOLDER BRIDGE" 18.199,47.854 r90 top locked
SB8 "Solder Bridge" "SOLDER BRIDGE" 24.021,33.479 r180 top locked
SB9 "Solder Bridge" "SOLDER BRIDGE" 13.403,32.514 r270 top locked
SB10 "Solder Bridge" "SOLDER BRIDGE" 14.351,23.978 r90 top locked
SB11 "Solder Bridge" "SOLDER BRIDGE" 15.708,23.978 r90 top locked
SB12 "Solder Bridge" "SOLDER BRIDGE" 17.065,24.028 r90 top locked
SB13 "Solder Bridge" "SOLDER BRIDGE" 18.422,24.028 r90 top locked
SB14 "Solder Bridge" "SOLDER BRIDGE" 19.779,24.054 r90 top locked
SB15 "Solder Bridge" "SOLDER BRIDGE" 21.136,24.054 r90 top locked
SB16 "Solder Bridge" "SOLDER BRIDGE" 22.494,24.054 r90 top locked
SB17 "Solder Bridge" "SOLDER BRIDGE" 23.851,24.054 r90 top locked
SB18 "Solder Bridge" "SOLDER BRIDGE" 26.035,26.721 r90 top locked
SB19 "Solder Bridge" "SOLDER BRIDGE" 27.356,26.721 r90 top locked
SB20 "Solder Bridge" "SOLDER BRIDGE" 30.632,26.721 r90 top locked
SB21 "Solder Bridge" "SOLDER BRIDGE" 29.058,26.721 r90 top locked
SB22 "Solder Bridge" "SOLDER BRIDGE" 5.918,26.721 r90 top locked
SB23 "Solder Bridge" "SOLDER BRIDGE" 7.239,26.721 r90 top locked
SB24 "Solder Bridge" "SOLDER BRIDGE" 9.068,26.721 r90 top locked
SB25 "Solder Bridge" "SOLDER BRIDGE" 10.363,26.721 r90 top locked
SB26 "Solder Bridge" "SOLDER BRIDGE" 12.243,3.835 r0 top locked
SB27 "Solder Bridge" "SOLDER BRIDGE" 15.088,1.219 r90 top locked
SB28 "Solder Bridge" "SOLDER BRIDGE" 19.304,-0.203 r180 top locked
SB29 "Solder Bridge" "SOLDER BRIDGE" 12.243,9.079 r0 top locked
SB30 "Solder Bridge" "SOLDER BRIDGE" 12.243,6.457 r0 top locked
SB31 "Solder Bridge" "SOLDER BRIDGE" 57.709,46.203 r180 top locked
SB32 "Solder Bridge" "SOLDER BRIDGE" 12.243,7.768 r0 top locked
SB33 "Solder Bridge" "Solder Bridge" 6.756,38.786 r180 top locked
SB34 "Solder Bridge" "SOLDER BRIDGE" 12.243,5.146 r0 top locked
SB35 "Solder Bridge" "SOLDER BRIDGE" 26.924,4.638 r180 top locked
SB36 "Solder Bridge" "SOLDER BRIDGE" 26.924,7.26 r180 top locked
SB37 "Solder Bridge" "SOLDER BRIDGE" 26.924,5.949 r180 top locked
SB38 "Solder Bridge" "SOLDER BRIDGE" 26.924,8.571 r180 top locked
SB39 "Solder Bridge" "SOLDER BRIDGE" 19.609,-6.528 r90 top locked
SB40 "Solder Bridge" "SOLDER BRIDGE" 42.545,11.506 r0 top locked
SB41 "Solder Bridge" "SOLDER BRIDGE" 42.545,8.848 r0 top locked
SB42 "Solder Bridge" "SOLDER BRIDGE" 42.545,10.177 r0 top locked
SB43 "Solder Bridge" "SOLDER BRIDGE" 57.785,39.319 r180 top locked
SB44 "Solder Bridge" "SOLDER BRIDGE" 42.545,7.518 r0 top locked
SB45 "Solder Bridge" "SOLDER BRIDGE" 57.969,8.026 r180 top locked
SB46 "Solder Bridge" "SOLDER BRIDGE" 56.38,10.736 r180 top locked
SB47 "Solder Bridge" "SOLDER BRIDGE" 57.969,9.356 r180 top locked
SB48 "Solder Bridge" "SOLDER BRIDGE" 56.38,12.065 r180 top locked
SB49 "Solder Bridge" "SOLDER BRIDGE" 15.367,47.854 r90 top locked
SB50 "Solder Bridge" "SOLDER BRIDGE" 6.553,44.958 r180 top locked
SB51 "Solder Bridge" "SOLDER BRIDGE" 26.06,-6.528 r270 top locked
SB52 "Solder Bridge" "SOLDER BRIDGE" 39.319,-6.528 r90 top locked
SB53 "Solder Bridge" "SOLDER BRIDGE" 33.172,-6.528 r270 top locked
SB54 "Solder Bridge" "SOLDER BRIDGE" 57.709,47.879 r180 top locked
SB55 "Solder Bridge" "SOLDER BRIDGE" 57.709,49.2 r180 top locked
SB56 "Solder Bridge" "SOLDER BRIDGE" 4.394,48.514 r0 top locked
SB57 "Solder Bridge" "SOLDER BRIDGE" 4.394,47.193 r0 top locked
SB58 "Solder Bridge" "SOLDER BRIDGE" 20.244,-11.506 r0 top locked
SB59 "Solder Bridge" "SOLDER BRIDGE" 20.244,-12.903 r0 top locked
SB60 "Solder Bridge" "SOLDER BRIDGE" 41.478,-11.608 r180 top locked
SB61 "Solder Bridge" "SOLDER BRIDGE" 41.453,-13.005 r180 top locked
SB62 "Solder Bridge" "SOLDER BRIDGE" 54.839,44.983 r180 top locked
SB63 "Solder Bridge" "SOLDER BRIDGE" 54.839,38.176 r180 top locked
SB64 "Solder Bridge" "SOLDER BRIDGE" 3.746,37.516 r180 top locked
SB65 "Solder Bridge" "SOLDER BRIDGE" 3.746,43.712 r180 top locked
SB66 "Solder Bridge" "SOLDER BRIDGE" 21.006,-9.373 r270 top locked
SB67 "Solder Bridge" "SOLDER BRIDGE" 27.381,-9.373 r270 top locked
SB68 "Solder Bridge" "SOLDER BRIDGE" 40.716,-9.347 r270 top locked
SB69 "Solder Bridge" "SOLDER BRIDGE" 34.481,-9.373 r270 top locked
SB70 "Solder Bridge" "SOLDER BRIDGE" 50.267,10.719 r180 top locked
SB71 "Solder Bridge" "SOLDER BRIDGE" 48.641,1.27 r0 top locked
SB72 "Solder Bridge" "SOLDER BRIDGE" 44.983,1.27 r0 top locked
SB73 "Solder Bridge" "SOLDER BRIDGE" 25.865,1.456 r0 top locked
SB74 "Solder Bridge" "SOLDER BRIDGE" 19.304,-1.473 r180 top locked
SB75 "Solder Bridge" "SOLDER BRIDGE" 25.865,-1.262 r180 top locked
SB76 "Solder Bridge" "SOLDER BRIDGE" 25.865,0.097 r180 top locked
SB77 "Solder Bridge" "SOLDER BRIDGE" 45.441,37.567 r270 top locked
SB78 "Solder Bridge" "SOLDER BRIDGE" 46.73,37.567 r90 top locked
SB79 "Solder Bridge" "SOLDER BRIDGE" 48.019,37.567 r90 top locked
SB80 "Solder Bridge" "SOLDER BRIDGE" 49.308,37.567 r270 top locked
SB81 "Solder Bridge" "SOLDER BRIDGE" 50.8,34.747 r180 top locked
SB82 "Solder Bridge" "SOLDER BRIDGE" 50.8,33.299 r180 top locked
SB83 "Solder Bridge" "SOLDER BRIDGE" 41.656,25.908 r90 top locked
SB84 "Solder Bridge" "SOLDER BRIDGE" 42.966,25.908 r90 top locked
SB85 "Solder Bridge" "SOLDER BRIDGE" 44.276,25.908 r90 top locked
SB86 "Solder Bridge" "SOLDER BRIDGE" 45.586,25.908 r90 top locked
SB87 "Solder Bridge" "SOLDER BRIDGE" 46.896,25.908 r90 top locked
SB88 "Solder Bridge" "SOLDER BRIDGE" 48.206,25.908 r90 top locked
SB89 "Solder Bridge" "SOLDER BRIDGE" 49.515,25.908 r90 top locked
SB90 "Solder Bridge" "SOLDER BRIDGE" 50.825,25.908 r90 top locked
SB91 "Solder Bridge" "SOLDER BRIDGE" 16.43,10.465 r0 top locked
SB92 "Solder Bridge" "SOLDER BRIDGE" 6.909,10.465 r0 top locked
SB93 "Solder Bridge" "SOLDER BRIDGE" 19.152,10.465 r180 top locked
SB94 "Solder Bridge" "SOLDER BRIDGE" 9.677,10.465 r180 top locked
SB95 "Solder Bridge" "SOLDER BRIDGE" 25.019,10.465 r0 top locked
SB96 "Solder Bridge" "SOLDER BRIDGE" 34.112,10.465 r0 top locked
SB97 "Solder Bridge" "SOLDER BRIDGE" 27.838,10.465 r180 top locked
SB98 "Solder Bridge" "SOLDER BRIDGE" 36.881,10.465 r180 top locked
SB99 "Solder Bridge" "SOLDER BRIDGE" 18.034,19.05 r270 top locked
SB100 "Solder Bridge" "SOLDER BRIDGE" 8.611,19.228 r270 top locked
SB101 "Solder Bridge" "SOLDER BRIDGE" 16.739,19.05 r270 top locked
SB102 "Solder Bridge" "SOLDER BRIDGE" 7.315,19.228 r270 top locked
SB103 "Solder Bridge" "SOLDER BRIDGE" 26.619,19.228 r270 top locked
SB104 "Solder Bridge" "SOLDER BRIDGE" 35.357,19.228 r270 top locked
SB105 "Solder Bridge" "SOLDER BRIDGE" 25.324,19.228 r270 top locked
SB106 "Solder Bridge" "SOLDER BRIDGE" 34.061,19.228 r270 top locked
SW1 "TS-1185EC-C-D-B" TS-1185EC-C-D-B 3.251,62.179 r219 top locked
U1 "ESP32-WROVER-E-N8R8" ESP32-WROVER-E-N8R8 30.569,53.67 r0 top locked
U2 "OPA344NA/250" SOT-23-5 58.438,43.893 r0 top locked
U3 "XC6220B331MR-G" SOT-25 -3.575,23.459 r0 top locked
U4 "ADS131M08IPBSR" 32TQFP 18.28,30.367 r90 top locked
U5 "PCM1865DBTR" PCM1865DBTR 19.495,4.497 r0 top locked
U6 "PCM1865DBTR" PCM1865DBTR 50.487,5.996 r0 top locked
U7 "OPA344NA/250" SOT-23-5 7.46,36.425 r0 top locked
U8 "OPA344NA/250" SOT-23-5 21.984,-5.697 r90 top locked
U9 "OPA344NA/250" SOT-23-5 58.438,37.06 r0 top locked
U10 "OPA344NA/250" SOT-23-5 7.32,42.621 r0 top locked
U11 "OPA344NA/250" SOT-23-5 28.319,-5.697 r90 top locked
U12 "OPA344NA/250" SOT-23-5 41.705,-5.697 r90 top locked
U13 "UMH3N" UMH3N 42.118,49.215 r0 top locked
U14 "OPA344NA/250" SOT-23-5 35.431,-5.697 r90 top locked
U15 "TLV320ADC5140IRTWT" "24-WQFN (4X4)" 46.271,32.539 r0 top locked
U16 "MAX4063ETE+T" "16-TQFN (4X4)" 16.204,15.013 r90 top locked
U17 "MAX4063ETE+T" "16-TQFN (4X4)" 7.263,15.013 r90 top locked
U18 "MAX4063ETE+T" "16-TQFN (4X4)" 25.144,15.013 r90 top locked
U19 "MAX4063ETE+T" "16-TQFN (4X4)" 34.085,15.011 r90 top locked
X1 "3TJ481920NYLBC" 3TJ481920NYLBC 19.601,38.457 r180 top locked
X2 "S3224576121060" S3224576121060 11.27,2.095 r180 bottom locked value=24.576MHz
X3 "S3224576121060" S3224576121060 41.554,4.166 r0 top locked value=24.576MHz

## Footprints (in the part's own frame and the unit in brackets; to place one, negate y for a bottom-side part, rotate by r counter-clockwise, add the part's x,y. Pads: shape width x height; smd on the part's side, far side on the other; paste and mask are expansions set on the pad)
3TJ481920NYLBC [mm]
  rect 1.4x1.2 smd mask+0.07: 1(-1.1,-0.85) 2(1.1,-0.85) 3(1.1,0.85) 4(-1.1,0.85)
  silkscreen extent -2.14,-1.3 1.65,1.3, body extent -1.6,-1.25 1.6,1.25, height 0.91
"16-TQFN (4X4)" [mm]
  rect 1.01x0.32 smd: 1(-1.86,0.975) 2(-1.86,0.325) 3(-1.86,-0.325) 4(-1.86,-0.975) 9(1.86,-0.975) 10(1.86,-0.325) 11(1.86,0.325) 12(1.86,0.975)
  rect 0.32x1.01 smd: 5(-0.975,-1.86) 6(-0.325,-1.86) 7(0.325,-1.86) 8(0.975,-1.86) 13(0.975,1.86) 14(0.325,1.86) 15(-0.325,1.86) 16(-0.975,1.86)
  rect 2.1x2.1 smd paste-0.39: 17(0,0)
  silkscreen extent -2.67,-2.05 2.05,2.05, body extent -2.04,-2.04 2.04,2.04, height 0.81
"24-WQFN (4X4)" [mm]
  rect 0.85x0.28 smd: 1(-1.975,1.25) 2(-1.975,0.75) 3(-1.975,0.25) 4(-1.975,-0.25) 5(-1.975,-0.75) 6(-1.975,-1.25) 13(1.975,-1.25) 14(1.975,-0.75) 15(1.975,-0.25) 16(1.975,0.25) 17(1.975,0.75) 18(1.975,1.25)
  rect 0.28x0.85 smd: 7(-1.25,-1.925) 8(-0.75,-1.925) 9(-0.25,-1.925) 10(0.25,-1.925) 11(0.75,-1.925) 12(1.25,-1.925) 19(1.25,1.925) 20(0.75,1.925) 21(0.25,1.925) 22(-0.25,1.925) 23(-0.75,1.925) 24(-1.25,1.925)
  rect 2.7x2.7 smd: 25(0,0)
  silkscreen extent -2.69,-2.06 2.06,2.06, body extent -2,-2 2,2, height 0.8
32TQFP [mm]
  rect 1.6x0.3 smd: 1(-3.1,1.75) 2(-3.1,1.25) 3(-3.1,0.75) 4(-3.1,0.25) 5(-3.1,-0.25) 6(-3.1,-0.75) 7(-3.1,-1.25) 8(-3.1,-1.75) 17(3.1,-1.75) 18(3.1,-1.25) 19(3.1,-0.75) 20(3.1,-0.25) 21(3.1,0.25) 22(3.1,0.75) 23(3.1,1.25) 24(3.1,1.75)
  rect 0.3x1.6 smd: 9(-1.75,-3.1) 10(-1.25,-3.1) 11(-0.75,-3.1) 12(-0.25,-3.1) 13(0.25,-3.1) 14(0.75,-3.1) 15(1.25,-3.1) 16(1.75,-3.1) 25(1.75,3.1) 26(1.25,3.1) 27(0.75,3.1) 28(0.25,3.1) 29(-0.25,3.1) 30(-0.75,3.1) 31(-1.25,3.1) 32(-1.75,3.1)
  silkscreen extent -3.53,-2.72 2.77,2.69, body extent -3.5,-3.51 3.5,3.49, height 1.25
"Cap 0402" [mil]
  rect 18x25 smd mask+2.36: 1(-18.5,0) 2(18.5,0)
  silkscreen extent -31,-16 31,16, body extent -20,-10 20,10, height 19
"Cap 0603" [mil]
  rect 30x35 smd mask+2.36: 1(-30,0) 2(30,0)
  silkscreen extent -49,-21 49,21, body extent -32,-16 31,16, height 34
CAP-0402 [mil]
  rect 18x25 smd mask+2.36: 1(-18.5,0) 2(18.5,0)
  silkscreen extent -31,-16 31,16, body extent -20,-10 20,10, height 19
Cap-0402 [mil]
  rect 18x25 smd mask+2.36: 1(-18.5,0) 2(18.5,0)
  silkscreen extent -31,-16 31,16, body extent -20,-10 20,10, height 19
Cap-0603 [mil]
  rect 30x35 smd mask+2.36: 1(-30,0) 2(30,0)
  silkscreen extent -49,-21 49,21, body extent -32,-16 31,16, height 34
CAP-0603 [mil]
  rect 30x35 smd mask+2.36: 1(-30,0) 2(30,0)
  silkscreen extent -49,-21 49,21, body extent -32,-16 31,16, height 34
CASE-D [mm]
  rect 2.4x2.9 smd: 1(-3.05,0) 2(3.05,0)
  silkscreen extent -4.9,-2.15 3.65,2.51, body extent -3.65,-2.16 3.65,2.14, height 4
ESP32-WROVER-E-N8R8 [mm]
  rect 1.5x0.9 smd: 1(-8.75,11.43) 2(-8.75,10.16) 3(-8.75,8.89) 4(-8.75,7.62) 5(-8.75,6.35) 6(-8.75,5.08) 7(-8.75,3.81) 8(-8.75,2.54) 9(-8.75,1.27) 10(-8.75,0) 11(-8.75,-1.27) 12(-8.75,-2.54) 13(-8.75,-3.81) 14(-8.75,-5.08) 15(-8.75,-6.35) 16(-8.75,-7.62) 17(-8.75,-8.89) 18(-8.75,-10.16) 19(-8.75,-11.43) 20(8.75,-11.43) 21(8.75,-10.16) 22(8.75,-8.89) 23(8.75,-7.62) 24(8.75,-6.35) 25(8.75,-5.08) 26(8.75,-3.81) 27(8.75,-2.54) 28(8.75,-1.27) 29(8.75,0) 30(8.75,1.27) 31(8.75,2.54) 32(8.75,3.81) 33(8.75,5.08) 34(8.75,6.35) 35(8.75,7.62) 36(8.75,8.89) 37(8.75,10.16) 38(8.75,11.43)
  rect 5x5 smd: 39(-1.241,3.945)
  Keep-Out Layer region: 9.06,12.501 -8.97,12.501 -8.97,18.87 9.06,18.87
  silkscreen extent -9.88,-12.53 9.06,18.87, body extent -8.95,-12.52 9.05,18.87, height 3.65
HDR1X5 [mm] "Connector; Header; 5 Position"
  rect 1.6x1.6 hole 0.95: 1(0,0)
  round 1.6 hole 0.95: 2(2.54,0) 3(5.08,0) 4(7.62,0) 5(10.16,0)
  silkscreen extent -1.27,-1.27 11.43,1.27, body extent -1.27,-1.27 11.43,1.23, height 8.65
HDR1X6 [mm] "Connector; Header; 6 Position"
  rect 1.5x1.5 hole 0.9: 1(0,0)
  round 1.5 hole 0.9: 2(2.54,0) 3(5.08,0) 4(7.62,0) 5(10.16,0) 6(12.7,0)
  silkscreen extent -1.27,-1.27 13.97,1.27, body extent -1.27,-1.24 13.97,1.25, height 8.54
"IND-0603 (1608 Metric)" [mm] "0.063\" L x 0.032\" W (1.60mm x 0.80mm)"
  rect 0.6x0.8 smd: 1(-0.7,0) 2(0.7,0)
  silkscreen extent -0.2,-0.46 0.23,0.46, body extent -0.8,-0.4 0.8,0.4, height 0.78
PCM1865DBTR [mm]
  rect 1.5x0.3 smd: 1(-2.9,3.5) 2(-2.9,3) 3(-2.9,2.5) 4(-2.9,2) 5(-2.9,1.5) 6(-2.9,1) 7(-2.9,0.5) 8(-2.9,0) 9(-2.9,-0.5) 10(-2.9,-1) 11(-2.9,-1.5) 12(-2.9,-2) 13(-2.9,-2.5) 14(-2.9,-3) 15(-2.9,-3.5) 16(2.9,-3.5) 17(2.9,-3) 18(2.9,-2.5) 19(2.9,-2) 20(2.9,-1.5) 21(2.9,-1) 22(2.9,-0.5) 23(2.9,0) 24(2.9,0.5) 25(2.9,1) 26(2.9,1.5) 27(2.9,2) 28(2.9,2.5) 29(2.9,3) 30(2.9,3.5)
  silkscreen extent -4.06,-3.94 1.98,3.94, body extent -3.2,-3.9 3.2,3.9, height 1.13
Res0603 [mil]
  rect 30x35 smd: 1(-30,0) 2(30,0)
  silkscreen extent -48,-21 48,21, body extent -31,-17 31,17, height 18
RES-0402 [mil]
  rect 18x25 smd mask+2.17: 1(-18.5,0) 2(18.5,0)
  silkscreen extent -32,-17 32,16, body extent -23,-11 23,11, height 16
Res-0603 [mil]
  rect 30x35 smd: 1(-30,0) 2(30,0)
  silkscreen extent -48,-21 48,21, body extent -31,-17 31,17, height 18
RES-0603 [mil]
  rect 30x35 smd: 1(-30,0) 2(30,0)
  silkscreen extent -48,-21 48,21, body extent -31,-17 31,17, height 18
S3224576121060 [mm] "24.576MHz SMD Crystal Resonator 12pF 60O ±10ppm -40?~+85? SMD3225-4P Crystals ROHS"
  rect 1.4x1.2 smd: 1(-1.1,-0.85) 2(1.1,-0.85) 3(1.1,0.85) 4(-1.1,0.85)
  silkscreen extent -2.18,-1.3 1.65,1.3, body extent -1.6,-1.25 1.6,1.25, height 0.82
"SOLDER BRIDGE" [mil] "Solder Bridge ON"
  rect 30x35 smd: 1(-30,0) 2(30,0)
  silkscreen extent -50,-22 50,22
"Solder Bridge" [mil] "Solder Bridge ON"
  rect 30x35 smd: 1(-30,0) 2(30,0)
  silkscreen extent -50,-22 50,22
SOT-23-5 [mm]
  rect 1.1x0.6 smd: 1(-1.3,0.95) 2(-1.3,0) 3(-1.3,-0.95) 4(1.3,-0.95) 5(1.3,0.95)
  silkscreen extent -2.13,-1.5 0.88,1.5, body extent -1.4,-1.45 1.4,1.45, height 1.45
SOT-25 [mm]
  rect 1x0.7 smd: 1(-1.2,0.95) 2(-1.2,0) 3(-1.2,-0.95) 4(1.2,-0.95) 5(1.2,0.95)
  silkscreen extent -1.63,-1.55 0.79,1.63, body extent -1.21,-1.5 1.19,1.5, height 1.1
SPH8878LR5H-1 [mm]
  rect 0.685x0.482 smd: 1(-0.817,1.027) 5(0.818,1.027)
  rect 0.685x0.523 smd: 2(-0.817,0.225) 4(0.818,0.225)
  round 1.625 / inner round 1.625 / far side round 0 hole 1.025: 3(0,-1.027)
  round 0.4 smd: 6(0,0.626)
  silkscreen extent -1.65,-2.13 1.37,1.47, body extent -1.33,-2.08 1.33,1.42, height 1.36
SPM0687LR5H-1 [mm]
  round 0.9 smd: 1(-1.204,1.703) 2(-1.204,-1.703) 4(1.204,-1.703) 5(1.204,1.703) 6(0,1.703)
  round 1.676 / inner round 1.676 / far side round 0 hole 1.025: 3(0,-0.913)
  silkscreen extent -2.16,-2.69 1.88,2.44, body extent -1.88,-2.68 1.88,2.38, height 1.15
TEST-POINT [mil]
  oct 60x60 smd: 1(0,0)
  silkscreen extent -37,-37 37,37
TS-1185EC-C-D-B [mm]
  rect 1.25x0.9 smd: 1(-1.925,0.75) 1(1.925,0.75) 2(-1.925,-0.75) 2(1.925,-0.75)
  silkscreen extent -2.39,-1.52 1.73,1.68, body extent -2.33,-1.5 2.32,1.5, height 2
U262-061N-4BVC11 [mm]
  rect 0.7x1 smd: A5(0.5,2.125) A9(1.52,2.125) A12(2.75,2.125) B5(-0.5,2.125) B9(-1.52,2.125) B12(-2.75,2.125)
  oval 1x2 hole 0.5 slot 1.4 at 90 deg: MH1(-4.32,1.625) MH2(4.32,1.625) MH3(4.32,-2.125) MH4(-4.32,-2.125)
  silkscreen extent -4.52,-3.49 4.52,0.34, body extent -4.47,-4.69 4.47,2.4, height 3.3
UDD32C03L01 [mm]
  rect 0.5x0.6 smd: 1(-1.15,0) 2(1.15,0)
  silkscreen extent -0.91,-0.71 0.99,0.71, body extent -1.3,-0.67 1.3,0.67, height 1.1
UMH3N [mm]
  rect 0.8x0.4 smd: 1(-0.97,0.65) 2(-0.97,0) 3(-0.97,-0.65) 4(0.97,-0.65) 5(0.97,0) 6(0.97,0.65)
  silkscreen extent -1.25,-1.14 0.48,1.17, body extent -1.2,-1.1 1.2,1.1, height 1.08
"X1SON - 0.45 mm max height" [mm] "TVS 6A@80/20µs 14V 6V 5.5V@(MAX)"
  rect 0.3x0.5 smd: 1(-0.35,0) 2(0.35,0)
  silkscreen extent -0.58,-0.33 0.58,0.47, body extent -0.5,-0.3 0.5,0.3, height 0.45